# Altium PCB TX_Node.PcbDoc
Units mm, origin at the board's own origin, x right, y up, seen from the top; angles counter-clockwise.
Board outline 152.27 x 83.82 mm, 2 copper layers (Top Layer, Bottom Layer); 12 components, 20 nets, 64 pads, 0 vias.
Unrouted connection lines stored in the file: 5.
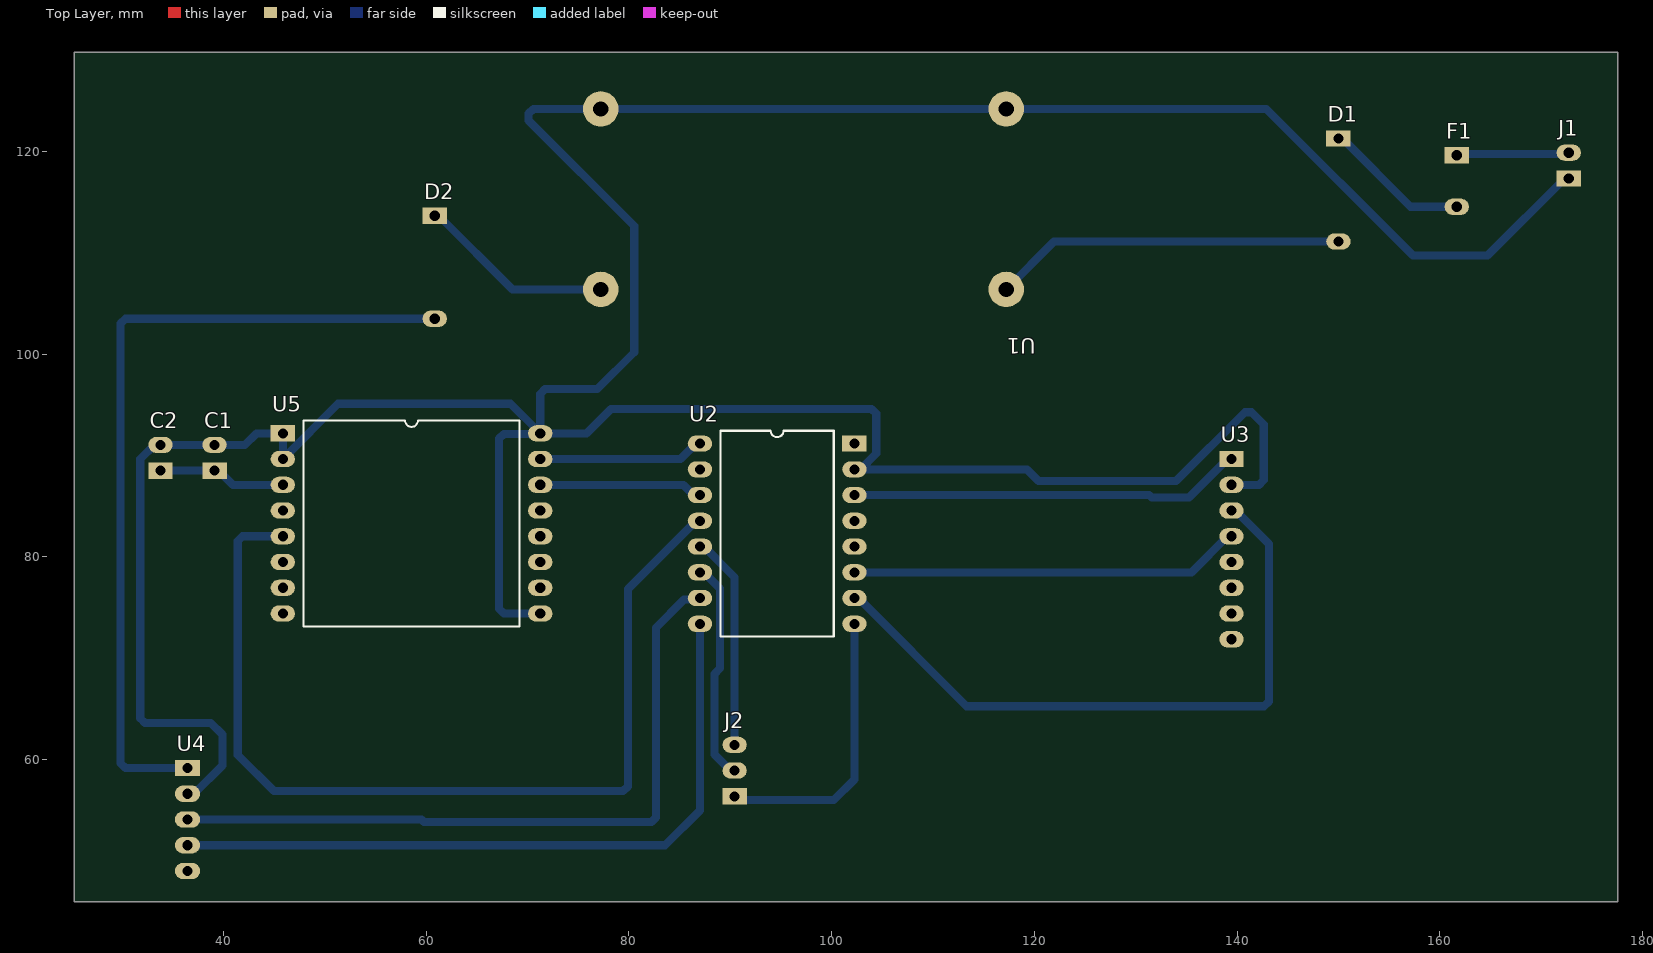
[diagram p0: Top Layer view]
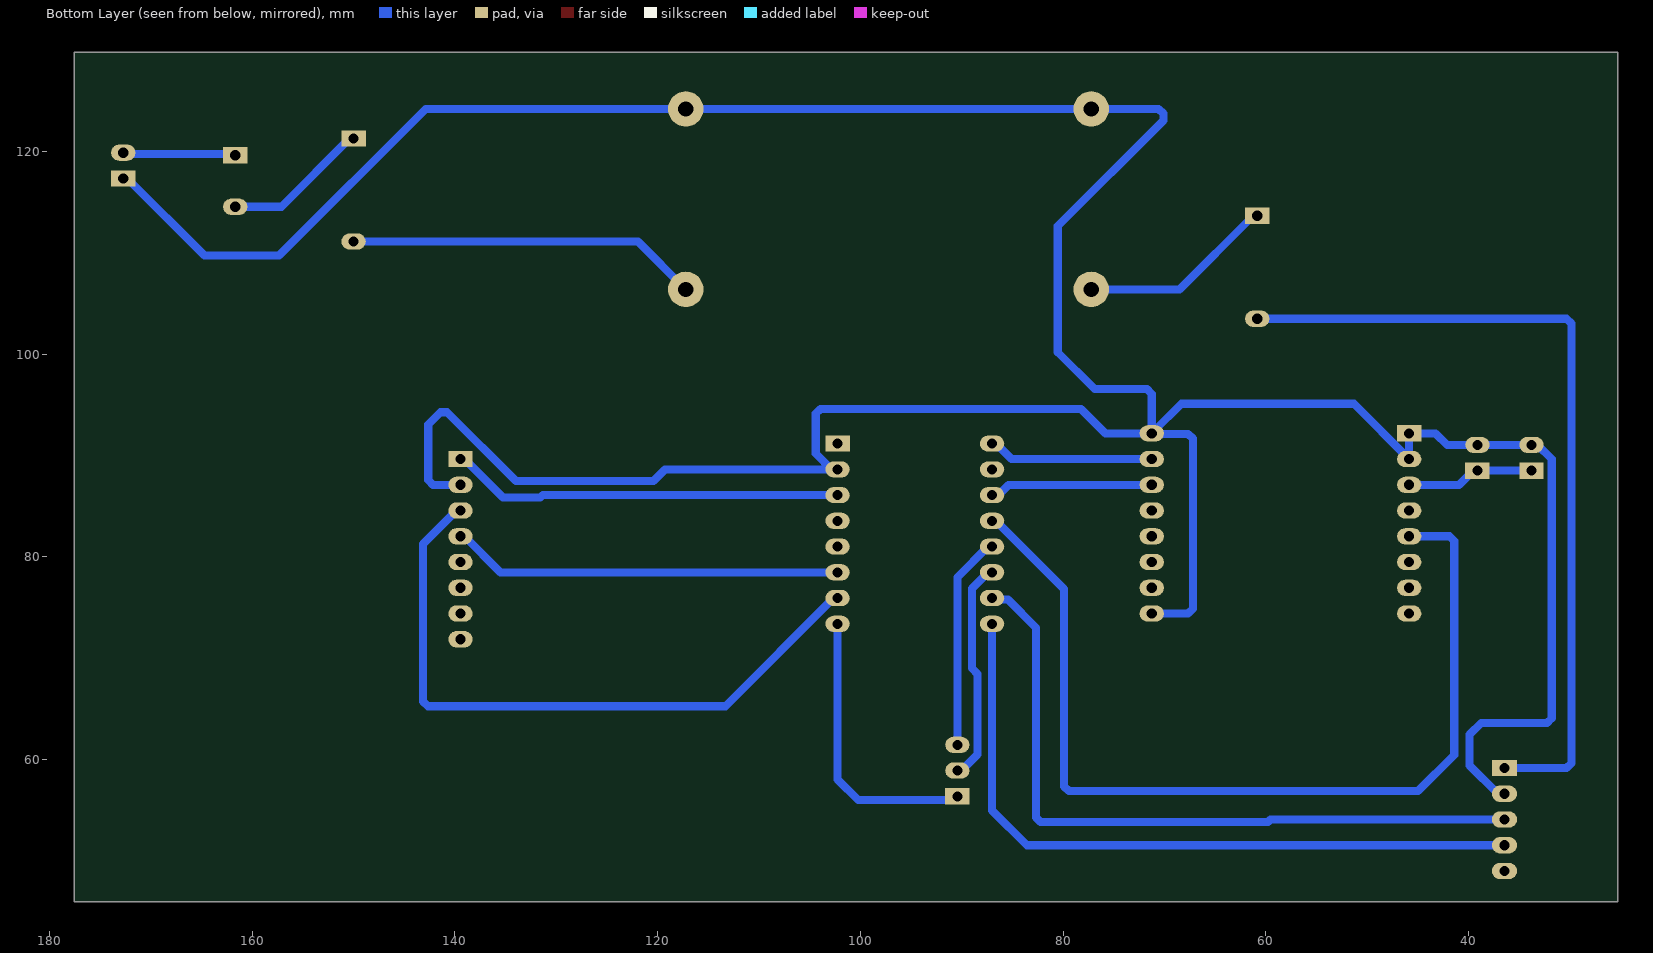
[diagram p1: Bottom Layer view, seen from below]

## Layer stack, top to bottom
Top Solder: solder mask 0.0102, Solder Resist, Dk 3.5
Top Layer: signal copper 0.0356
Dielectric 1: dielectric 0.32, FR-4, Dk 4.8
Bottom Layer: signal copper 0.0356
Bottom Solder: solder mask 0.0102, Solder Resist, Dk 3.5

## Board outline
25.273,129.794 25.273,45.974 177.546,45.974 177.546,129.794

## Design rules (kind name [scope] priority, off if disabled: settings)
Clearance [All] p1: gap=0.4 ignorepadtopadclearanceinfootprint=FALSE
PolygonConnect [All] p1: connectstyle=Relief reliefconductorwidth=0.254 reliefentries=4 polygonreliefangle="90 Angle" airgapwidth=0.254
RoutingVias [All] p1: holewidth=0.9 width=2 viastyle="Through Hole" minholewidth=0.9 minwidth=2 maxholewidth=0.9 maxwidth=2
SolderMaskExpansion [All] p1: expansion=0.102 istentingtop=FALSE
SupplyNets "Schematic Supply Nets_2" [InNet('+3.3')] p1: voltage=0.000
SupplyNets "Schematic Supply Nets_1" [InNet('+5')] p2: voltage=0.000
SupplyNets "Schematic Supply Nets" [InNet('GND')] p3: voltage=0.000
Width [All] p1: maxlimit=1.5 minlimit=0.5 preferedwidth=0.8 minimp=50.000000 maximp=50.000000 favimp=50.000000
30 further rules are at their usual default settings.

## Components (designator, comment, footprint, x,y, rotation, side; value= is the part's Value field where it differs from the comment)
C1 "Capacitor" HDR_1X2 39.116,88.519 r180 top value=100u
C2 "Capacitor" HDR_1X2 33.782,88.519 r180 top value=100n
D1 "Schottky Diode" TH_10MM 149.987,121.285 r0 top
D2 "Schottky Diode" TH_10MM 60.833,113.665 r0 top
F1 "Fuse" TH_5MM 161.671,119.634 r0 top
J1 "HDR2" HDR_1X2 172.72,117.348 r180 top
J2 "HDR3" HDR_1X3 90.424,56.388 r180 top
U1 "LM2596_Module" LM2596_MODULE 117.216,106.406 r180 top
U2 "ESP32C3_SuperMini" ESP32C3_SUPERMINI 94.615,82.296 r0 top
U3 "MPU6050_GY521" GY521_1X8 139.446,89.662 r0 top
U4 "NEO_M8N" NEO_M8N_1X5 36.449,59.182 r0 top
U5 "SX1278" SX1278_BREAKOUT 58.547,83.312 r0 top

## Footprints (in the part's own frame and the unit in brackets; to place one, negate y for a bottom-side part, rotate by r counter-clockwise, add the part's x,y. Pads: shape width x height; smd on the part's side, far side on the other; paste and mask are expansions set on the pad)
ESP32C3_SUPERMINI [mm]
  rect 2.4x1.6 hole 1: 1(7.62,8.89)
  oval 2.4x1.6 hole 1: 2(7.62,6.35) 3(7.62,3.81) 4(7.62,1.27) 5(7.62,-1.27) 6(7.62,-3.81) 7(7.62,-6.35) 8(7.62,-8.89) 9(-7.62,-8.89) 10(-7.62,-6.35) 11(-7.62,-3.81) 12(-7.62,-1.27) 13(-7.62,1.27) 14(-7.62,3.81) 15(-7.62,6.35) 16(-7.62,8.89)
  silkscreen extent -5.59,-10.16 5.59,10.16
GY521_1X8 [mm]
  rect 2.4x1.6 hole 1: 1(0,0)
  oval 2.4x1.6 hole 1: 2(0,-2.54) 3(0,-5.08) 4(0,-7.62) 5(0,-10.16) 6(0,-12.7) 7(0,-15.24) 8(0,-17.78)
HDR_1X2 [mm]
  rect 2.4x1.6 hole 1: 1(0,0)
  oval 2.4x1.6 hole 1: 2(0,-2.54)
HDR_1X3 [mm]
  rect 2.4x1.6 hole 1: 1(0,0)
  oval 2.4x1.6 hole 1: 2(0,-2.54) 3(0,-5.08)
LM2596_MODULE [mm]
  round 3.5 hole 1.5: 1(0,0) 2(0,-17.8) 3(40,0) 4(40,-17.8)
NEO_M8N_1X5 [mm]
  rect 2.5x1.6 hole 1: 1(0,0)
  oval 2.5x1.6 hole 1: 2(0,-2.54) 3(0,-5.08) 4(0,-7.62) 5(0,-10.16)
SX1278_BREAKOUT [mm]
  rect 2.4x1.6 hole 1: 1(-12.7,8.89)
  oval 2.4x1.6 hole 1: 2(-12.7,6.35) 3(-12.7,3.81) 4(-12.7,1.27) 5(-12.7,-1.27) 6(-12.7,-3.81) 7(-12.7,-6.35) 8(-12.7,-8.89) 9(12.7,-8.89) 10(12.7,-6.35) 11(12.7,-3.81) 12(12.7,-1.27) 13(12.7,1.27) 14(12.7,3.81) 15(12.7,6.35) 16(12.7,8.89)
  silkscreen extent -10.67,-10.16 10.67,10.16
TH_5MM [mm]
  rect 2.4x1.6 hole 1: 1(0,0)
  oval 2.4x1.6 hole 1: 2(0,-5.08)
TH_10MM [mm]
  rect 2.4x1.6 hole 1: 1(0,0)
  oval 2.4x1.6 hole 1: 2(0,-10.16)

## Part data
F1: CURRENT=1, RESISTANCE=1m, SimulationGenericComponent=True
C1 C2: SimulationGenericComponent=True
D1 D2: AF=1, BV=0, BV_MAX=1e99, CJO=0, CJP=0, CTA=0, CTP=0, EG=1.11, FC=0.5, FCS=0.5, FV_MAX=1e99, IBV=0.001, IKF=0, IKR=0, IS=1e-14, ISR=1e-14, JSW=0, JTUN=0, JTUNSW=0, KEG=1, KF=0, LEVEL=1, MJSW=0.33, N=1, NBV=1, NR=1, NS=1, NTUN=30, PHP=1, RS=0, SimulationGenericComponent=True, TCV=0, TLEV=0, TLEVC=0, TM1=0, TM2=0, TNOM=27, TPB=0, TPHP=0, TRS=0, TRS2=0, TT=0, TTT1=0, TTT2=0, VJ=1, XTI=3, XTITUN=3

## Nets (pads, with @x,y where several pads share a name; then routed paths per layer and width w, separated by ;. In a path a pad name is that pad's centre, name@x,y a point inside that pad or via, vN(x,y) a via of type N, cw(c..) or ccw(c..) an arc to the next point about the centre after c; other vN are vias at no path point)
+3.3: C1.1 C2.1 U2.3 U3.1 U5.3 | length 51.5
  Bottom Layer w0.8: C2.1 C1.1 39.516,88.519 40.913,87.122 U5.3 ; U2.3 131.318,86.106 131.572,85.852 135.236,85.852 139.046,89.662 U3.1
+5: D2.2 U2.1 U4.1 | length 81.8
  Top Layer w0.8: D2.2 D2.2@61.233,103.505
  Bottom Layer w0.8: U4.1 30.314,59.182 29.845,59.651 29.845,103.036 30.314,103.505 D2.2
GND: C1.2 C2.2 J1.1 U1.2 U1.4 U2.2 U3.2 U4.2 U5.1 U5.2 U5.9 U5.16 | length 362.4
  Bottom Layer w0.8: U4.2@35.808,56.642 U4.2 37.09,56.642 39.878,59.43 39.878,62.484 38.735,63.627 32.251,63.627 31.782,64.096 31.782,89.65 33.191,91.059 C2.2 C1.2 42.095,91.059 43.238,92.202 U5.1 U5.2 51.308,95.123 68.326,95.123 U5.16@71.047,92.402 ; U5.9 67.652,74.422 67.183,74.891 67.183,91.674 67.652,92.142 U5.16@71.307,92.142 ; U2.2 U2.2@102.826,88.646 ; U3.2 142.152,87.122 142.621,87.591 142.621,93.091 141.428,94.284 140.766,94.284 133.985,87.503 120.396,87.503 119.253,88.646 U2.2@102.826,88.646 ; J1.1 172.32,117.348 164.719,109.747 157.334,109.747 142.875,124.206 U1.2 U1.4 70.561,124.206 70.092,123.737 70.092,123.075 80.518,112.649 80.518,100.203 76.872,96.557 71.716,96.557 71.247,96.089 U5.16 75.819,92.202 78.232,94.615 103.925,94.615 104.394,94.146 104.394,90.214 U2.2@102.826,88.646
GPS_RX: U2.9 U4.4 | length 70.4
  Bottom Layer w0.8: U4.4 83.566,51.562 86.995,54.991 U2.9
GPS_TX: U2.10 U4.3 | length 70.8
  Bottom Layer w0.8: U4.3 59.535,54.102 59.789,53.848 82.208,53.848 82.677,54.317 82.677,73.025 85.445,75.793 86.842,75.793 U2.10
I2C_SCL: U2.7 U3.3 | length 66.5
  Bottom Layer w0.8: U2.7 102.635,75.946 113.303,65.278 142.66,65.278 143.129,65.747 143.129,81.299 139.846,84.582 U3.3 U3.3@139.046,84.582
I2C_SDA: U2.6 U3.4 | length 38.7
  Bottom Layer w0.8: U2.6 135.49,78.486 139.046,82.042 U3.4
LORA_DIO0: U2.13 U5.5 | length 95.3
  Bottom Layer w0.8: U5.5 41.871,82.042 41.402,81.573 41.402,60.452 44.958,56.896 79.414,56.896 79.883,57.365 79.883,76.854 86.595,83.566 U2.13
LORA_MISO: U2.15 U5.13 | length 0.4
  Top Layer w0.8: U2.15@86.595,88.646 U2.15
LORA_MOSI: U2.14 U5.14 | length 16.2
  Bottom Layer w0.8: U5.14 85.363,87.122 86.379,86.106 U2.14
LORA_NSS: U2.16 U5.15 | length 16.4
  Bottom Layer w0.8: U5.15 85.071,89.662 86.595,91.186 U2.16
LORA_RST: U2.5 U5.4
LORA_SCK: U2.4 U5.12
NetD1_1: D1.1 F1.2 | length 14.5
  Bottom Layer w0.8: D1.1 150.387,121.285 157.118,114.554 F1.2
NetD1_2: D1.2 U1.1 | length 34.7
  Bottom Layer w0.8: U1.1 121.935,111.125 D1.2
NetD2_1: D2.1 U1.3 | length 19.4
  Bottom Layer w0.8: D2.1 61.233,113.665 68.492,106.406 U1.3
NetF1_1: F1.1 J1.2 | length 11.2
  Bottom Layer w0.8: F1.1 161.798,119.761 172.593,119.761 J1.2
NetJ2_1: J2.1 U2.8 | length 28.9
  Bottom Layer w0.8: J2.1 90.805,56.007 100.203,56.007 102.235,58.039 U2.8 102.419,73.406 U2.8@102.788,73.036
NetJ2_2: J2.2 U2.11 | length 21.9
  Bottom Layer w0.8: U2.11 87.395,78.486 88.995,76.886 88.995,69.023 88.424,68.452 88.424,60.528 90.024,58.928 J2.2
NetJ2_3: J2.3 U2.12 | length 21.2
  Bottom Layer w0.8: U2.12 87.395,81.026 90.424,77.997 J2.3
pads on no net: U3.5 U3.6 U3.7 U3.8 U4.5 U5.6 U5.7 U5.8 U5.10 U5.11

## Silkscreen, mask and mechanical layers (free items; w line width, h text height)
Mechanical 1:
  lines w0.254: 25.019,129.794 25.273,129.54 25.273,45.72 25.527,45.974 177.038,45.974 177.546,45.466 177.546,129.794 25.019,129.794